# Altium PCB AD_pcb.PcbDoc
Units mil, origin at the board's own origin, x right, y up, seen from the top; angles counter-clockwise.
Board outline 6000 x 2330 mil, 2 copper layers (Top Layer, Bottom Layer); 6 components, 0 nets, 323 pads, 0 vias.
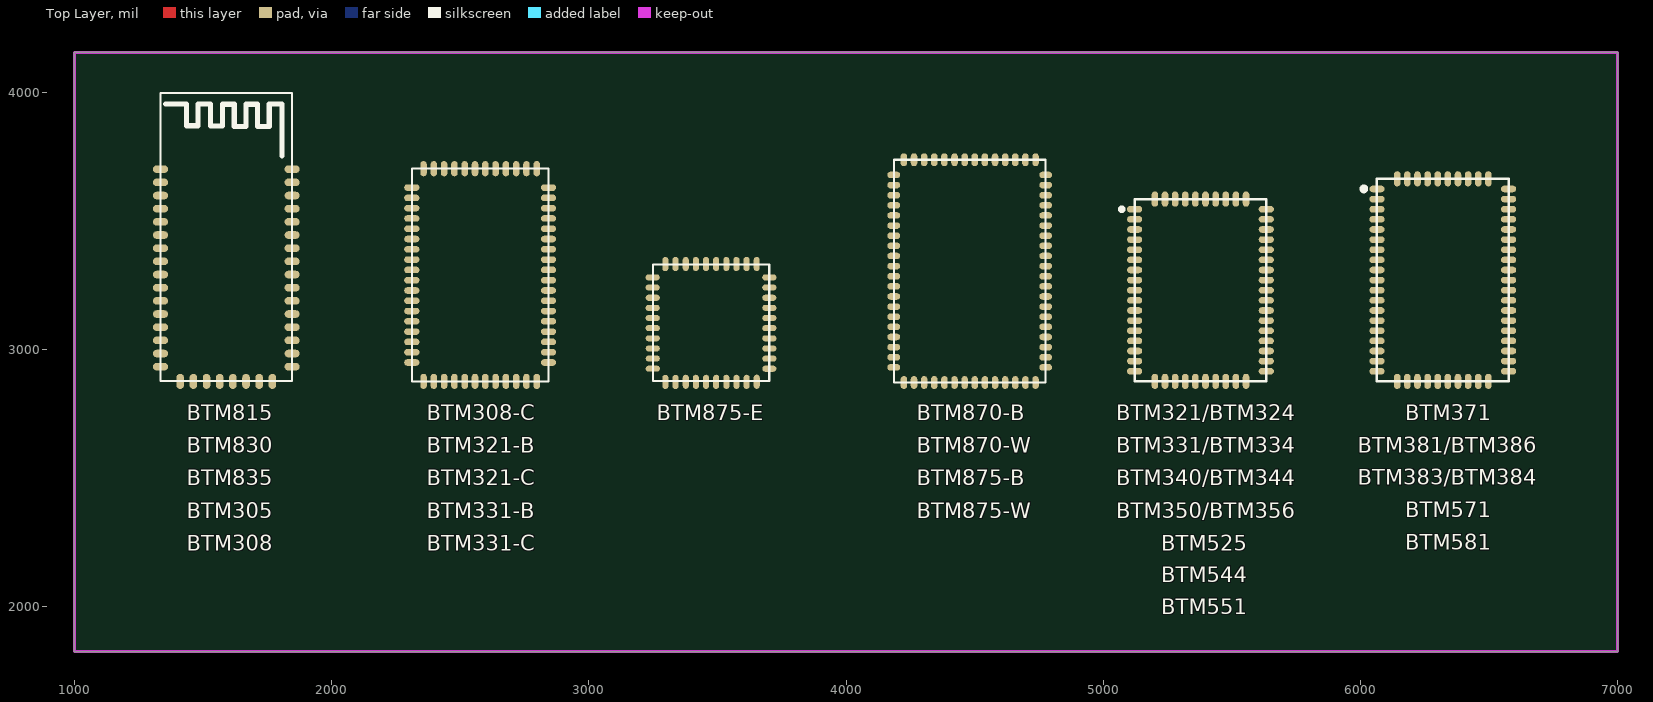
[diagram p0: Top Layer view]
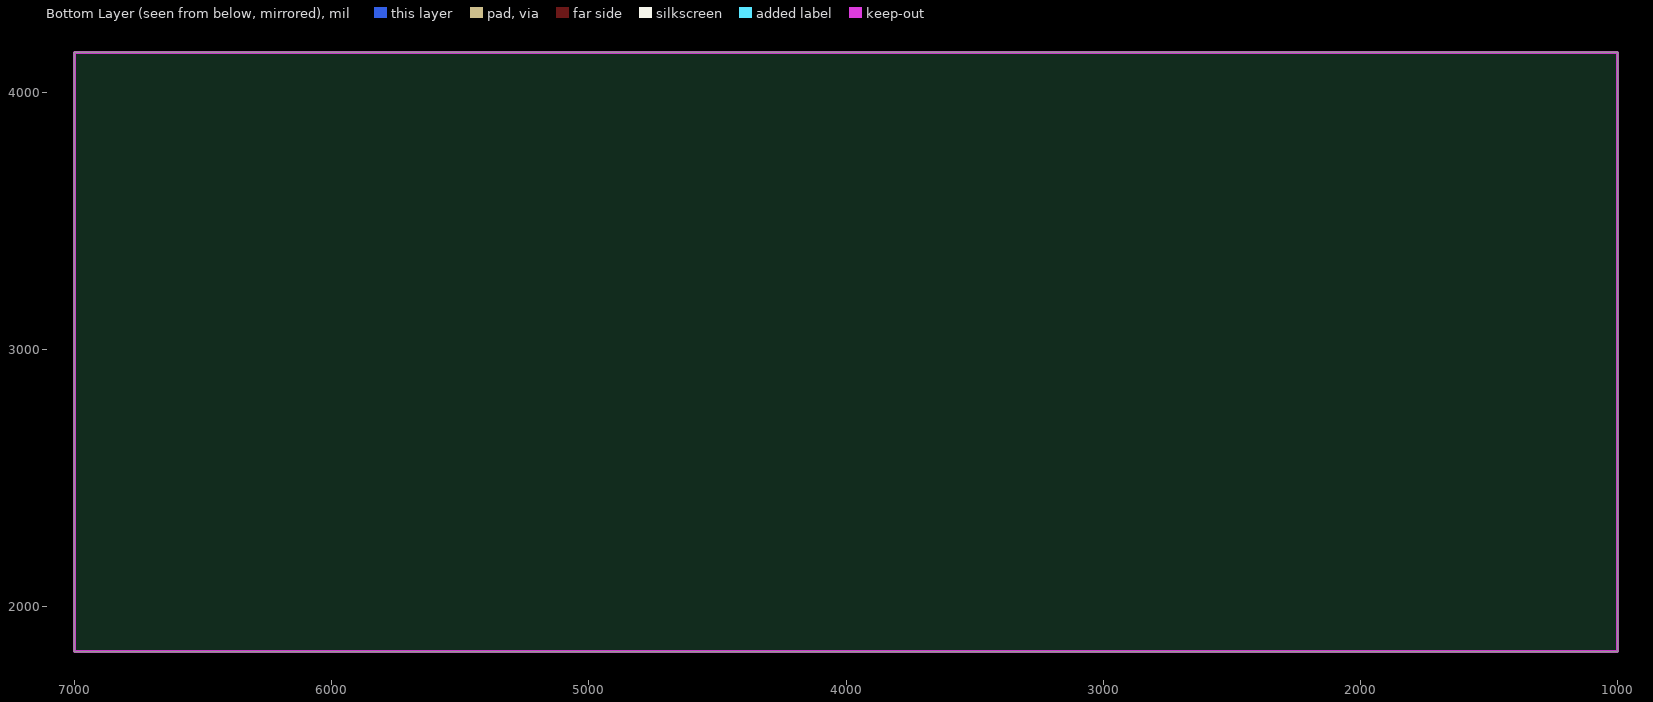
[diagram p1: Bottom Layer view, seen from below]

## Layer stack, top to bottom
Top Solder: solder mask 0.4, Solder Resist, Dk 3.5
Top Layer: signal copper 1.4
Dielectric 1: dielectric 12.6, FR-4, Dk 4.8
Bottom Layer: signal copper 1.4
Bottom Solder: solder mask 0.4, Solder Resist, Dk 3.5

## Board outline
1000,1825 1000,4155 7000,4155 7000,1825

## Design rules (kind name [scope] priority, off if disabled: settings)
Clearance [All] p1: gap=10
PolygonConnect [All] p1: connectstyle=Relief reliefconductorwidth=10 reliefentries=4 polygonreliefangle="90 Angle" airgapwidth=10
RoutingVias [All] p1: holewidth=28 width=50 viastyle="Through Hole" minholewidth=28 minwidth=50 maxholewidth=28 maxwidth=50
SolderMaskExpansion [All] p1: expansion=4
Width [All] p1: maxlimit=10 minlimit=10 preferedwidth=10
30 further rules are at their usual default settings.

## Components (designator, comment, footprint, x,y, rotation, side; value= is the part's Value field where it differs from the comment)
? "" BTM571 6320,3269.37 r0 top
? "" BTM05F 1590.91,3288.07 r0 top
? "" BTM625-C 2577.74,3289.05 r0 top
? "" BTM875-E 3475.23,3102.89 r0 top
? "" BTM870-B 4480.99,3304.21 r0 top
? "" BTM524 5377.9,3230 r0 top

## Footprints (in the part's own frame and the unit in brackets; to place one, negate y for a bottom-side part, rotate by r counter-clockwise, add the part's x,y. Pads: shape width x height; smd on the part's side, far side on the other; paste and mask are expansions set on the pad)
BTM05F [mm]
  oval 1.5x0.75 smd: 1(-6.5,10.475) 2(-6.5,9.175) 3(-6.5,7.875) 4(-6.5,6.575) 5(-6.5,5.275) 6(-6.5,3.975) 7(-6.5,2.675) 8(-6.5,1.375) 9(-6.5,0.075) 10(-6.5,-1.225) 11(-6.5,-2.525) 12(-6.5,-3.825) 13(-6.5,-5.125) 14(-6.5,-6.425) 15(-6.5,-7.725) 16(-6.5,-9.025) 25(6.5,-9.025) 26(6.5,-7.725) 27(6.5,-6.425) 28(6.5,-5.125) 29(6.5,-3.825) 30(6.5,-2.525) 31(6.5,-1.225) 32(6.5,0.075) 33(6.5,1.375) 34(6.5,2.675) 35(6.5,3.975) 36(6.5,5.275) 37(6.5,6.575) 38(6.5,7.875) 39(6.5,9.175) 40(6.5,10.475)
  oval 0.75x1.5 smd: 17(-4.55,-10.475) 18(-3.25,-10.475) 19(-1.95,-10.475) 20(-0.65,-10.475) 21(0.65,-10.475) 22(1.95,-10.475) 23(3.25,-10.475) 24(4.55,-10.475)
  silkscreen extent -6.51,-10.45 6.49,18, body extent -6.51,-10.45 6.49,18, height 2.6
BTM524 [mm]
  oval 1.5x0.65 smd: 1(-6.5,8) 2(-6.5,7) 3(-6.5,6) 4(-6.5,5) 5(-6.5,4) 6(-6.5,3) 7(-6.5,2) 8(-6.5,1) 9(-6.5,0) 10(-6.5,-1) 11(-6.5,-2) 12(-6.5,-3) 13(-6.5,-4) 14(-6.5,-5) 15(-6.5,-6) 16(-6.5,-7) 17(-6.5,-8) 28(6.5,-8) 29(6.5,-7) 30(6.5,-6) 31(6.5,-5) 32(6.5,-4) 33(6.5,-3) 34(6.5,-2) 35(6.5,-1) 36(6.5,0) 37(6.5,1) 38(6.5,2) 39(6.5,3) 40(6.5,4) 41(6.5,5) 42(6.5,6) 43(6.5,7) 44(6.5,8)
  oval 0.65x1.5 smd: 18(-4.5,-9) 19(-3.5,-9) 20(-2.5,-9) 21(-1.5,-9) 22(-0.5,-9) 23(0.5,-9) 24(1.5,-9) 25(2.5,-9) 26(3.5,-9) 27(4.5,-9) 45(4.5,9) 46(3.5,9) 47(2.5,9) 48(1.5,9) 49(0.5,9) 50(-0.5,9) 51(-1.5,9) 52(-2.5,9) 53(-3.5,9) 54(-4.5,9)
  silkscreen extent -7.9,-9 6.5,9, body extent -6.5,-9 6.5,9, height 2.6
BTM571 [mm]
  oval 1.5x0.65 smd: 1(-6.5,9) 2(-6.5,8) 3(-6.5,7) 4(-6.5,6) 5(-6.5,5) 6(-6.5,4) 7(-6.5,3) 8(-6.5,2) 9(-6.5,1) 10(-6.5,0) 11(-6.5,-1) 12(-6.5,-2) 13(-6.5,-3) 14(-6.5,-4) 15(-6.5,-5) 16(-6.5,-6) 17(-6.5,-7) 18(-6.5,-8) 19(-6.5,-9) 30(6.5,-9) 31(6.5,-8) 32(6.5,-7) 33(6.5,-6) 34(6.5,-5) 35(6.5,-4) 36(6.5,-3) 37(6.5,-2) 38(6.5,-1) 39(6.5,0) 40(6.5,1) 41(6.5,2) 42(6.5,3) 43(6.5,4) 44(6.5,5) 45(6.5,6) 46(6.5,7) 47(6.5,8) 48(6.5,9)
  oval 0.65x1.5 smd: 20(-4.5,-10) 21(-3.5,-10) 22(-2.5,-10) 23(-1.5,-10) 24(-0.5,-10) 25(0.5,-10) 26(1.5,-10) 27(2.5,-10) 28(3.5,-10) 29(4.5,-10) 49(4.5,10) 50(3.5,10) 51(2.5,10) 52(1.5,10) 53(0.5,10) 54(-0.5,10) 55(-1.5,10) 56(-2.5,10) 57(-3.5,10) 58(-4.5,10)
  silkscreen extent -7.98,-10 6.5,10, body extent -6.5,-10 6.5,10, height 2.6
BTM625-C [mm]
  oval 1.5x0.65 smd: 1(-6.75,8.636) 2(-6.75,7.62) 3(-6.75,6.604) 4(-6.75,5.588) 5(-6.75,4.572) 6(-6.75,3.556) 7(-6.75,2.54) 8(-6.75,1.524) 9(-6.75,0.508) 10(-6.75,-0.508) 11(-6.75,-1.524) 12(-6.75,-2.54) 13(-6.75,-3.556) 14(-6.75,-4.572) 15(-6.75,-5.588) 16(-6.75,-6.604) 17(-6.75,-7.62) 18(-6.75,-8.636) 31(6.75,-8.636) 32(6.75,-7.62) 33(6.75,-6.604) 34(6.75,-5.588) 35(6.75,-4.572) 36(6.75,-3.556) 37(6.75,-2.54) 38(6.75,-1.524) 39(6.75,-0.508) 40(6.75,0.508) 41(6.75,1.524) 42(6.75,2.54) 43(6.75,3.556) 44(6.75,4.572) 45(6.75,5.588) 46(6.75,6.604) 47(6.75,7.62) 48(6.75,8.636)
  round 0.8 on Top Overlay: 4(-8.169,8.617)
  oval 0.65x1.5 smd: 19(-5.588,-10.5) 20(-4.572,-10.5) 21(-3.556,-10.5) 22(-2.54,-10.5) 23(-1.524,-10.5) 24(-0.508,-10.5) 25(0.508,-10.5) 26(1.524,-10.5) 27(2.54,-10.5) 28(3.556,-10.5) 29(4.572,-10.5) 30(5.588,-10.5) 49(5.588,10.5) 50(4.572,10.5) 51(3.556,10.5) 52(2.54,10.5) 53(1.524,10.5) 54(0.508,10.5) 55(-0.508,10.5) 56(-1.524,10.5) 57(-2.54,10.5) 58(-3.556,10.5) 59(-4.572,10.5) 60(-5.588,10.5)
  silkscreen extent -6.75,-10.5 6.75,10.5, body extent -6.75,-10.5 6.75,10.5, height 2.6
BTM870-B [mm]
  oval 1.27x0.65 smd: 1(-7.5,9.5) 2(-7.5,8.5) 3(-7.5,7.5) 4(-7.5,6.5) 5(-7.5,5.5) 6(-7.5,4.5) 7(-7.5,3.5) 8(-7.5,2.5) 9(-7.5,1.5) 10(-7.5,0.5) 11(-7.5,-0.5) 12(-7.5,-1.5) 13(-7.5,-2.5) 14(-7.5,-3.5) 15(-7.5,-4.5) 16(-7.5,-5.5) 17(-7.5,-6.5) 18(-7.5,-7.5) 19(-7.5,-8.5) 20(-7.5,-9.5) 35(7.5,-9.5) 36(7.5,-8.5) 37(7.5,-7.5) 38(7.5,-6.5) 39(7.5,-5.5) 40(7.5,-4.5) 41(7.5,-3.5) 42(7.5,-2.5) 43(7.5,-1.5) 44(7.5,-0.5) 45(7.5,0.5) 46(7.5,1.5) 47(7.5,2.5) 48(7.5,3.5) 49(7.5,4.5) 50(7.5,5.5) 51(7.5,6.5) 52(7.5,7.5) 53(7.5,8.5) 54(7.5,9.5)
  round 0.8 on Top Overlay: 6(-8.815,9.492)
  oval 0.65x1.27 smd: 21(-6.499,-11) 22(-5.499,-11) 23(-4.499,-11) 24(-3.499,-11) 25(-2.499,-11) 26(-1.499,-11) 27(-0.499,-11) 28(0.501,-11) 29(1.501,-11) 30(2.501,-11) 31(3.501,-11) 32(4.501,-11) 33(5.501,-11) 34(6.501,-11) 55(6.499,11) 56(5.499,11) 57(4.499,11) 58(3.499,11) 59(2.499,11) 60(1.499,11) 61(0.499,11) 62(-0.501,11) 63(-1.501,11) 64(-2.501,11) 65(-3.501,11) 66(-4.501,11) 67(-5.501,11) 68(-6.501,11)
  silkscreen extent -7.5,-11 7.5,11, body extent -7.5,-11 7.5,11, height 2.6
BTM875-E [mm]
  oval 1.4x0.6 smd: 1(-5.76,4.497) 2(-5.759,3.496) 3(-5.755,2.486) 4(-5.754,1.485) 5(-5.754,0.484) 6(-5.754,-0.517) 7(-5.753,-1.517) 8(-5.753,-2.518) 9(-5.753,-3.519) 10(-5.752,-4.52) 21(5.76,-4.521) 22(5.759,-3.52) 23(5.759,-2.52) 24(5.759,-1.519) 25(5.758,-0.518) 26(5.758,0.483) 27(5.758,1.484) 28(5.757,2.484) 29(5.753,3.494) 30(5.752,4.495)
  round 0.8 on Top Overlay: 7(-7.117,4.487)
  oval 0.6x1.4 smd: 11(-4.503,-5.821) 12(-3.502,-5.821) 13(-2.492,-5.816) 14(-1.491,-5.816) 15(-0.49,-5.816) 16(0.51,-5.815) 17(1.511,-5.815) 18(2.512,-5.815) 19(3.513,-5.814) 20(4.514,-5.814) 31(4.511,5.821) 32(3.51,5.821) 33(2.509,5.821) 34(1.509,5.82) 35(0.508,5.82) 36(-0.493,5.82) 37(-1.494,5.819) 38(-2.495,5.819) 39(-3.505,5.814) 40(-4.505,5.814)
  silkscreen extent -5.75,-5.75 5.75,5.75, body extent -5.75,-5.75 5.75,5.75, height 2.6

## Nets (pads, with @x,y where several pads share a name; then routed paths per layer and width w, separated by ;. In a path a pad name is that pad's centre, name@x,y a point inside that pad or via, vN(x,y) a via of type N, cw(c..) or ccw(c..) an arc to the next point about the centre after c; other vN are vias at no path point)
pads on no net: ?.1 ?.2 ?.3 ?.4 ?.5 ?.6 ?.7 ?.8 ?.9 ?.10 ?.11 ?.12 ?.13 ?.14 ?.15 ?.16 ?.17 ?.18 ?.19 ?.20 ?.21 ?.22 ?.23 ?.24 ?.25 ?.26 ?.27 ?.28 ?.29 ?.30 ?.31 ?.32 ?.33 ?.34 ?.35 ?.36 ?.37 ?.38 ?.39 ?.40 ?.41 ?.42 ?.43 ?.44 ?.45 ?.46 ?.47 ?.48 ?.49 ?.50 ?.51 ?.52 ?.53 ?.54 ?.55 ?.56 ?.57 ?.58 ?.59 ?.60 ?.61 ?.62 ?.63 ?.64 ?.65 ?.66 ?.67 ?.68

## Keep-outs
Keep-Out Layer:
  lines w11.81: 1000,1825 7000,1825 7000,4155 1010,4155 1000,4155 1000,1825

## Silkscreen, mask and mechanical layers (free items; w line width, h text height)
Top Overlay:
  text "BTM815" at 1437.35,2725 h59.06
  text "BTM308-C" at 2370,2725 h59.06
  text "BTM875-E" at 3265,2725 h59.06
  text "BTM870-B" at 4275,2725 h59.06
  text "BTM321/BTM324" at 5050,2725 h59.06
  text "BTM371" at 6175,2725 h59.06
  text "BTM381/BTM386" at 5990,2599.17 h59.06
  text "BTM830" at 1437.35,2598 h59.06
  text "BTM321-B" at 2370,2598 h59.06
  text "BTM870-W" at 4275,2598 h59.06
  text "BTM331/BTM334" at 5050,2598 h59.06
  text "BTM383/BTM384" at 5990,2473.33 h59.06
  text "BTM835" at 1437.35,2471 h59.06
  text "BTM321-C" at 2370,2471 h59.06
  text "BTM875-B" at 4275,2471 h59.06
  text "BTM340/BTM344" at 5050,2471 h59.06
  text "BTM571" at 6175,2347.5 h59.06
  text "BTM305" at 1437.35,2344 h59.06
  text "BTM331-B" at 2370,2344 h59.06
  text "BTM875-W" at 4275,2344 h59.06
  text "BTM350/BTM356" at 5050,2344 h59.06
  text "BTM581" at 6175,2221.67 h59.06
  text "BTM308" at 1437.35,2217 h59.06
  text "BTM331-C" at 2370,2217 h59.06
  text "BTM525" at 5225,2217 h59.06
  text "BTM544" at 5225,2095 h59.06
  text "BTM551" at 5225,1970 h59.06